# Altium PCB ChrisByrd-IoT_Product.PcbDoc (part 2 of 6)
Units mil, origin at the board's own origin, x right, y up, seen from the top; angles counter-clockwise.
Board outline 5314.96 x 4000 mil, 2 copper layers (Top Layer, Bottom Layer), stack 57 mil thick; 306 components, 230 nets, 1006 pads, 531 vias.
Unrouted connection lines stored in the file: 476.
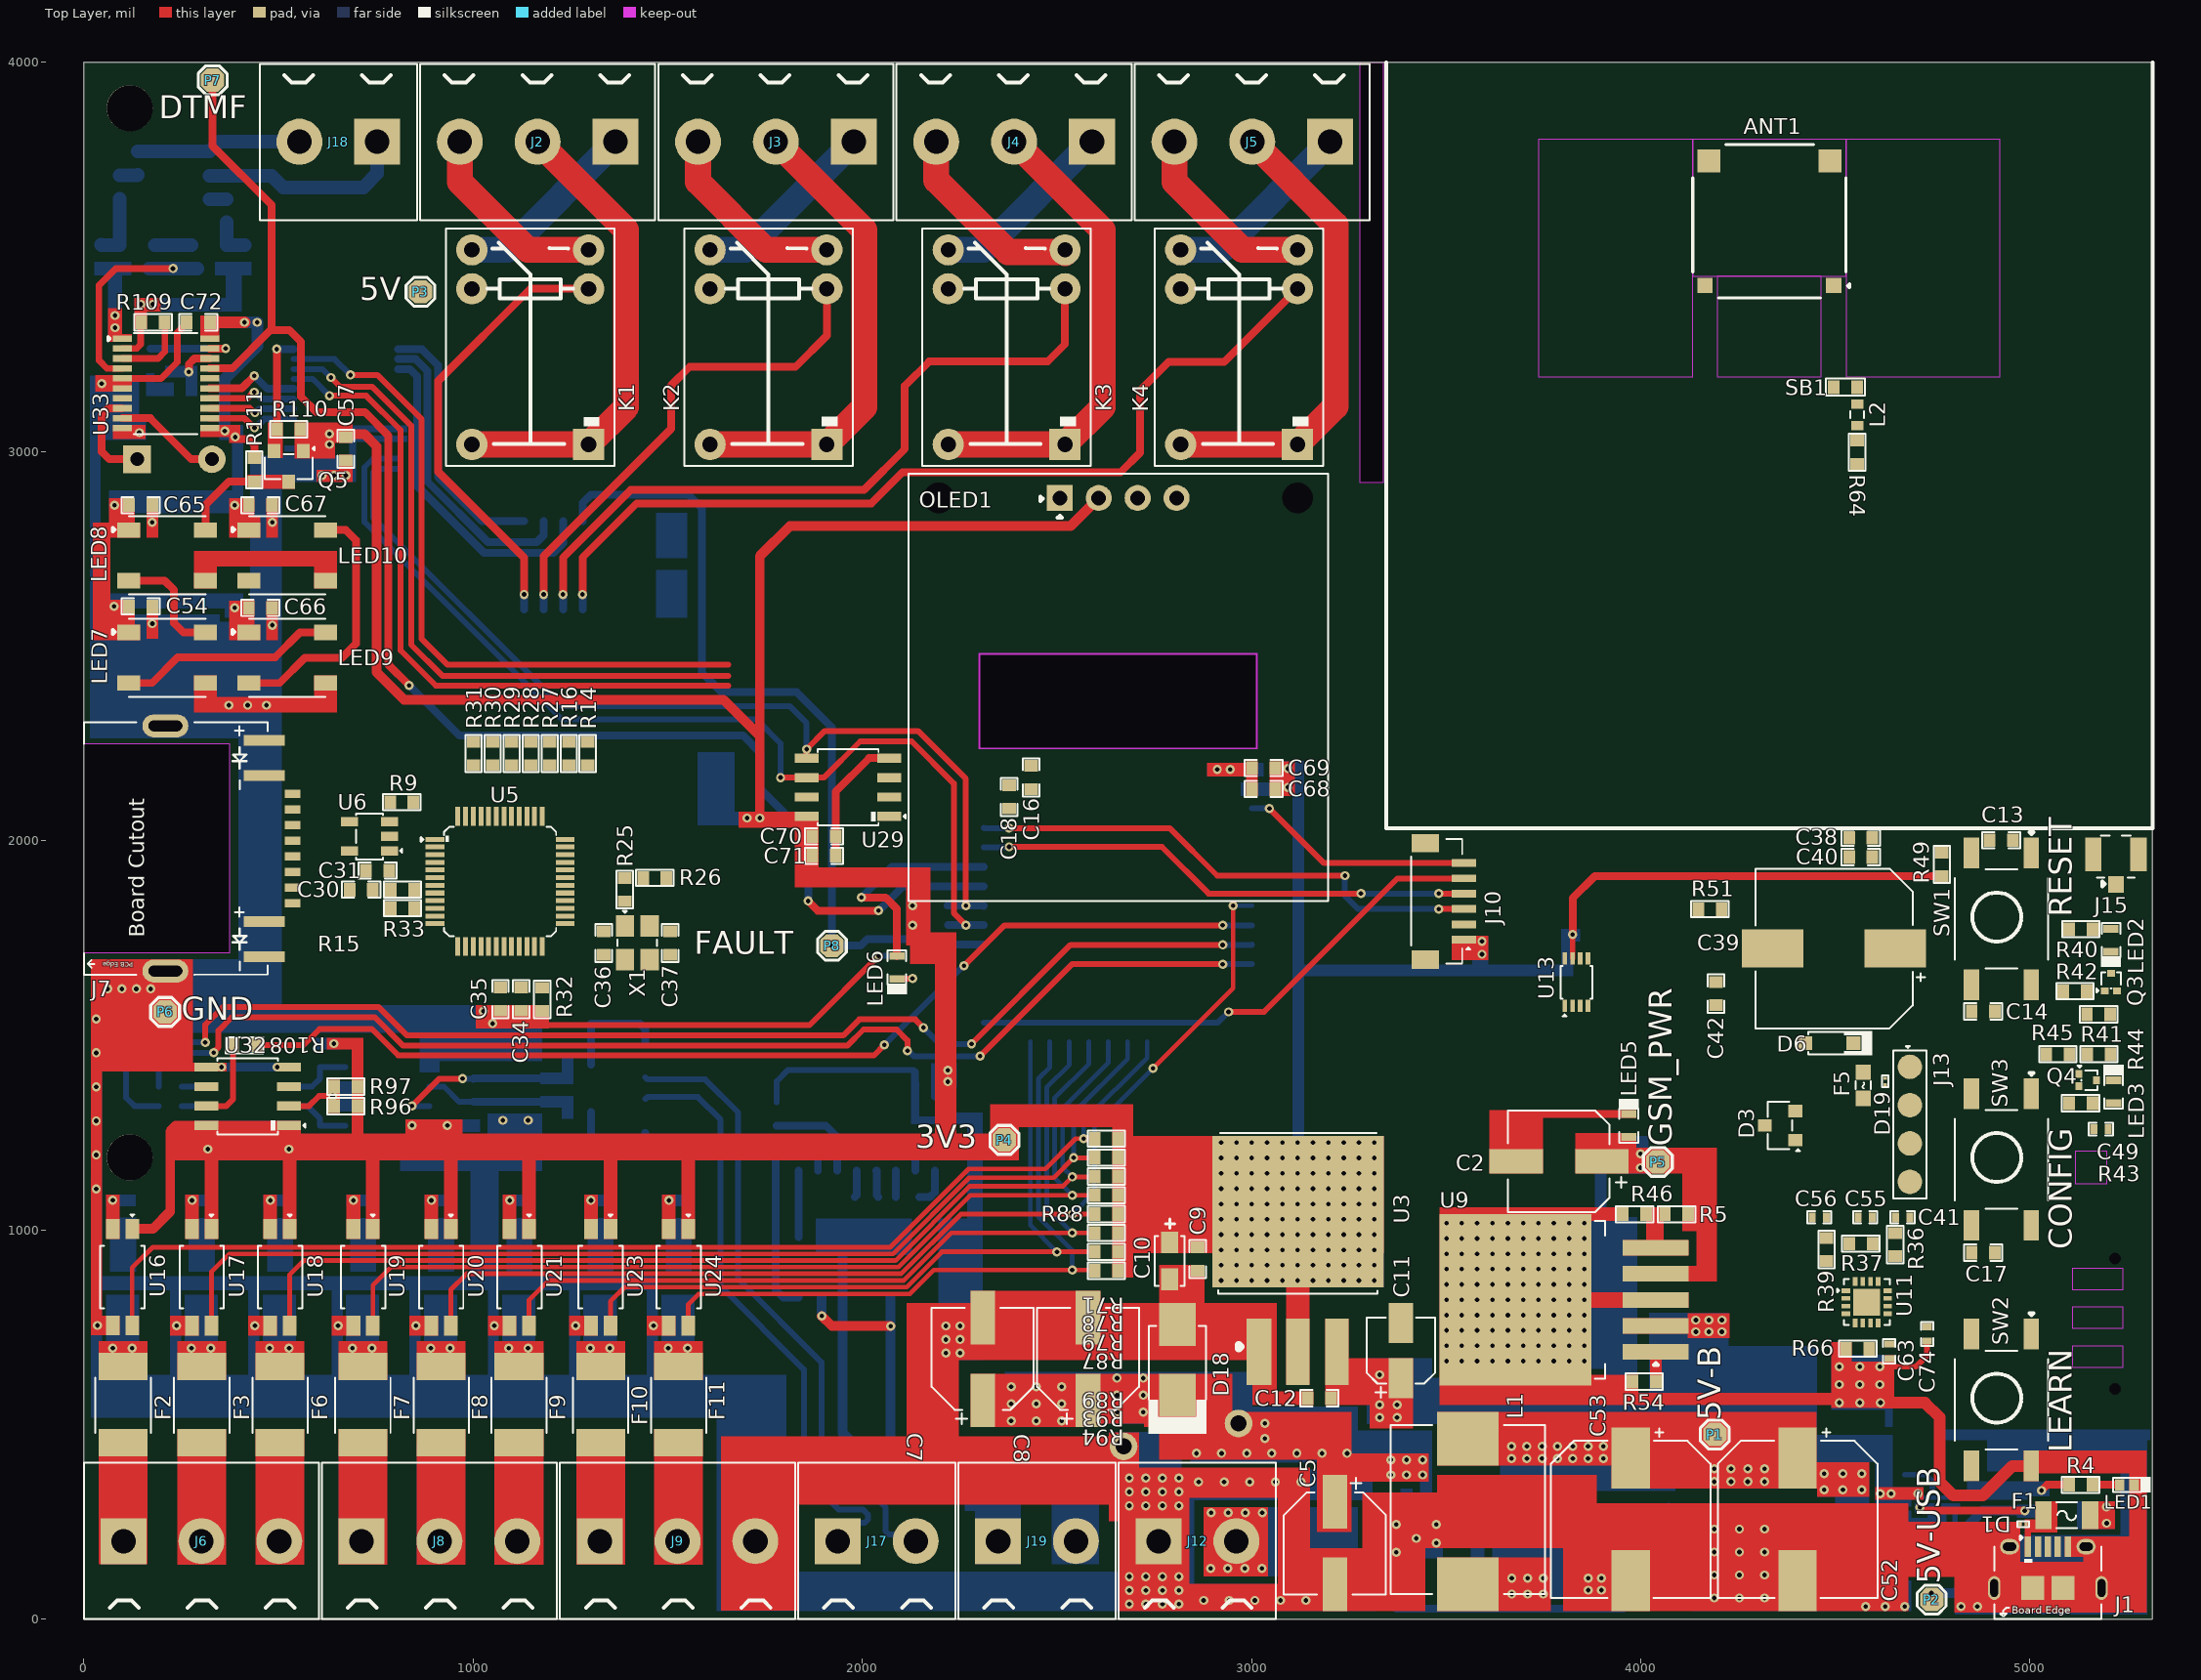
[diagram p0: Top Layer view]

## Part data (continued)
C32: library part CGA3E2X7R2A223K080AA, "CAP CER 0.022UF 100V X7R 0603", Case Code (Imperial)=0603, Case Code (Metric)=1608, Dielectric=X7R, LCSC Part Number=C2167165, Manufacturer=TDK, Max Operating Temperature=125°C, Min Operating Temperature=-55°C, Package Quantity=1, Ratings=AEC-Q200, Resistor Type=Ceramic, Supplier Part Number 1=445-5814-1-ND, Tolerance=10%, Voltage Rating=100V, Capacitance=22nF, Case/Package=0603, Category="Ceramic Capacitors", ComponentLink1Description=https://datasheet.ciiva.com/22725/1735406-22725648.pdf?src-supplier=Element14, ComponentLink1URL=https://datasheet.ciiva.com/22725/1735406-22725648.pdf?src-supplier=Element14, ComponentLink2Description=https://datasheet.ciiva.com/24218/cga3e2x7r2a223k080aa-266292-24218959.pdf?src-supplier=Mouser, ComponentLink2URL=https://datasheet.ciiva.com/24218/cga3e2x7r2a223k080aa-266292-24218959.pdf?src-supplier=Mouser, ComponentLink3Description=https://datasheet.ciiva.com/7975/1807242-7975349.pdf?src-supplier=Element14, ComponentLink3URL=https://datasheet.ciiva.com/7975/1807242-7975349.pdf?src-supplier=Element14, Depth=0.8mm, Height=0.8mm, Item Type=Capacitor, Length=1.6mm, Manufacturer Part Number=CGA3E2X7R2A223K080AA, Mount="Surface Mount", Packaging="Tape and Reel", Pricing 1="1=0.11000, 10=0.07600, 50=0.04340, 100=0.03590, 500=0.02516, 1000=0.02083 (USD)", REACH SVHC="No SVHC", RoHS=Yes, RoHS Compliant=Yes, Series=CGA, Stock 1=56079, Supplier 1=Digi-Key, Termination=SMD/SMT, Thickness=0.035inch, Voltage Rating (DC)=100V, Weight=7.1E-05oz, Width=0.031inch